# Altium PCB MB_v2.PcbDoc (part 3 of 10)
Units mm, origin at the board's own origin, x right, y up, seen from the top; angles counter-clockwise.
Board outline 203 x 72 mm, 6 copper layers (Top Layer, Layer 3, Layer 1, Layer 2, Layer 4, Bottom Layer), stack 1.52 mm thick; 655 components, 570 nets, 2931 pads, 1834 vias.
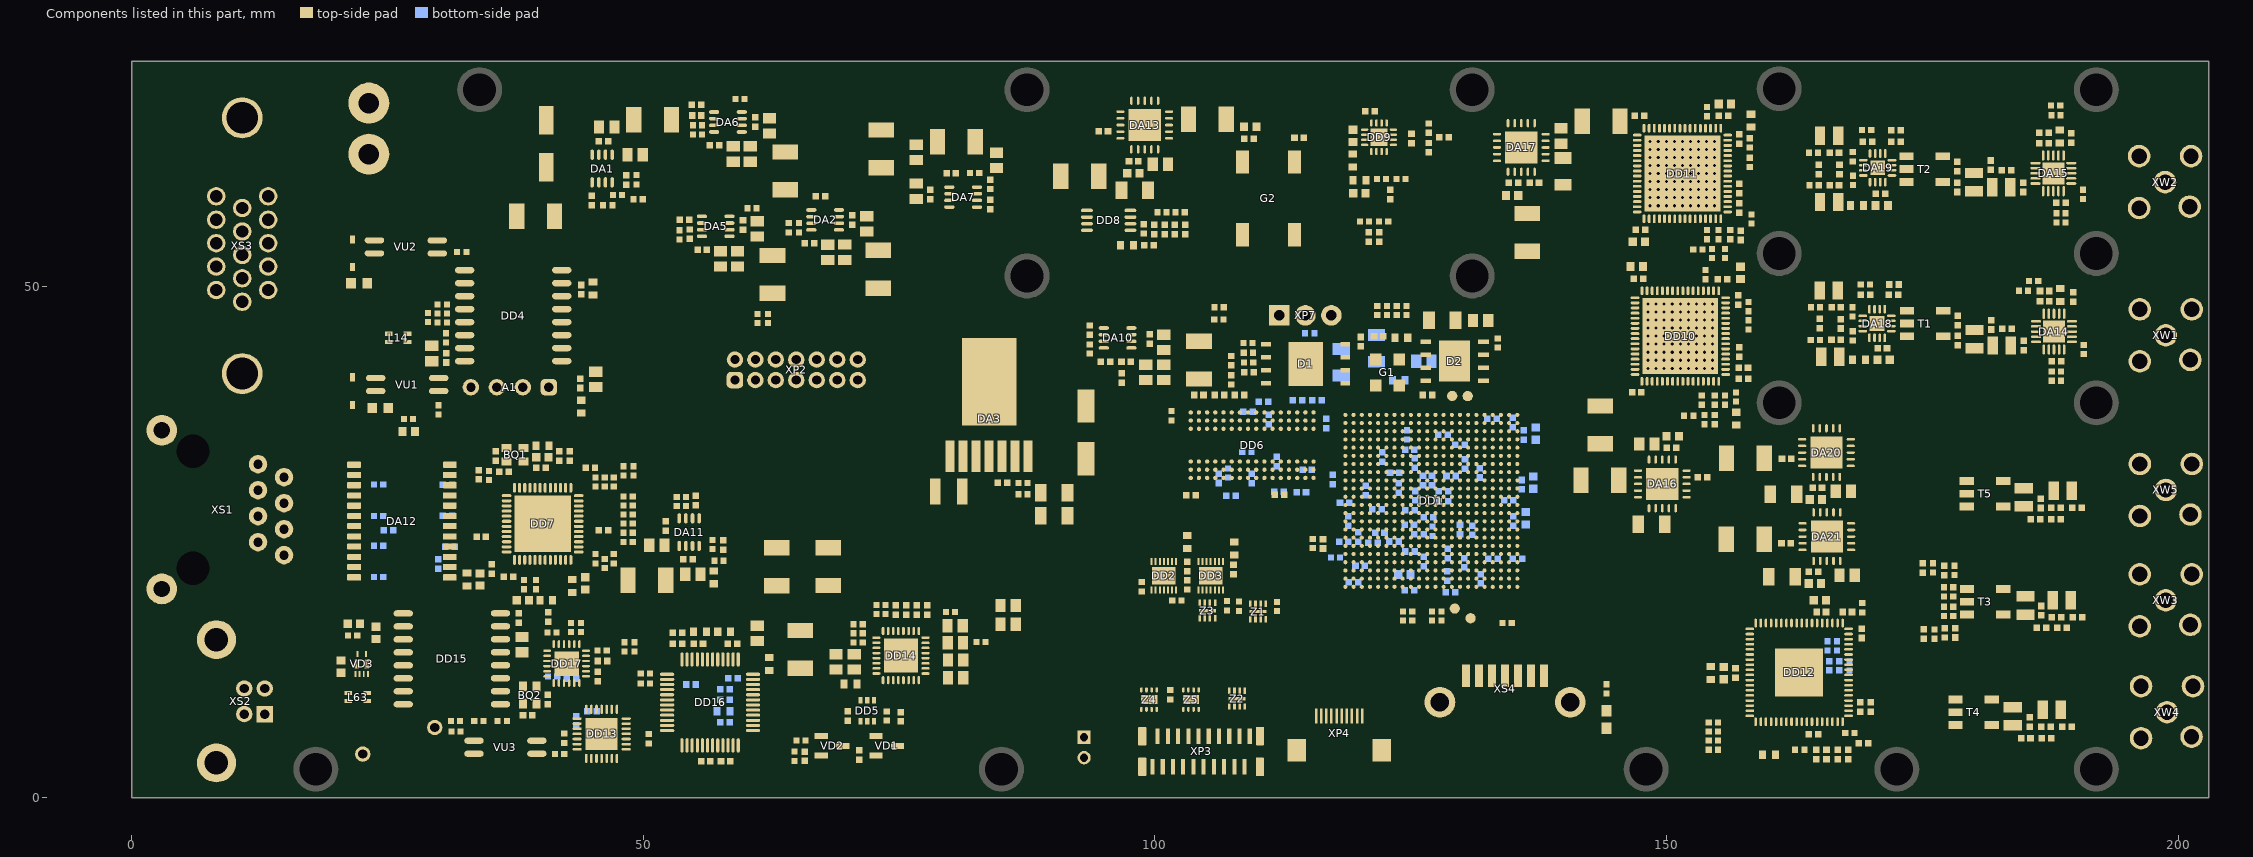
[diagram p6: the components of this part, seen from the top]

## Part data (continued)
R46: library part "Чип резистор 0402 120 Ом, 5%", "ЧИП-резистор", Tolerance=±5%, PackageReference=0402, TKE="100 ppm/°С"
R47 R48 R56: library part "Чип резистор 0402 80,6 Ом, 1%_1", "ЧИП-резистор", Tolerance=±1%, PackageReference=0402, TKE="100 ppm/°С"
R50: library part "Чип резистор 0402 9,53 кОм, 1%", "ЧИП-резистор", Tolerance=±1%, PackageReference=0402, TKE="100 ppm/°С"
R52 R53 R54 R55 R61 R75 R76 R78 R79 R81 R83 R98 R100 R119 R121 R123 R125 R139: library part "Чип резистор 0402 1 кОм, 5%", "ЧИП-резистор", Tolerance=±5%, PackageReference=0402, TKE="100 ppm/°С"
R57: library part "Чип резистор 0402 240 Ом, 5%", "ЧИП-резистор", Tolerance=±5%, PackageReference=0402, TKE="100 ppm/°С"
R60 R65 R66 R67 R68 R69: library part "Чип резистор 0402 22 Ом, 5%", "ЧИП-резистор", Tolerance=±5%, PackageReference=0402, TKE="100 ppm/°С"
R63: library part "Чип резистор 0402 5,76 кОм, 1%", "ЧИП-резистор", Tolerance=±1%, PackageReference=0402, TKE="100 ppm/°С"
R70: library part "Чип резистор 0402 120 кОм, 5%", "ЧИП-резистор", Tolerance=±5%, PackageReference=0402, TKE="100 ppm/°С"
R80: library part "Чип резистор 0402 12.4 кОм, 1%", "ЧИП-резистор", Tolerance=±1%, PackageReference=0402, TKE="100 ppm/°С"
R82 R84 R85 R86: library part "Чип резистор 0402 75 Ом, 5%", "ЧИП-резистор", Tolerance=±5%, PackageReference=0402, TKE="100 ppm/°С"
R87 R178: library part "Чип резистор 0402 330 Ом, 5%", "ЧИП-резистор", Tolerance=±5%, PackageReference=0402, TKE="100 ppm/°С"
R89 R90 R92 R93 R99 R113 R115 R116 R117 R118 R128 R129 R130 R135 R136 R140 R141 R142 R143 R184 R185 R186 R187 R188: library part "Чип резистор 0402 100 Ом, 5%", "ЧИП-резистор", Tolerance=±5%, PackageReference=0402, TKE="100 ppm/°С"
R101 R103 R105 R107: library part "Чип резистор 0402 130 Ом, 5%", "ЧИП-резистор", Tolerance=±5%, PackageReference=0402, TKE="100 ppm/°С"
R102 R104 R106 R108: library part "Чип резистор 0402 82 Ом, 5%", "ЧИП-резистор", Tolerance=±5%, PackageReference=0402, TKE="100 ppm/°С"
R120 R126 R169: library part "Чип резистор 0402 200 Ом, 5%", "ЧИП-резистор", Tolerance=±5%, PackageReference=0402, TKE="100 ppm/°С"
R131 R132 R133 R134: library part "Чип резистор 0402 10 Ом, 5%", "ЧИП-резистор", Tolerance=±5%, PackageReference=0402, TKE="100 ppm/°С"
R137 R138: library part "Чип резистор 0402 47 Ом, 5%", "ЧИП-резистор", Tolerance=±5%, PackageReference=0402, TKE="100 ppm/°С"
R145: library part "Чип резистор 0402 2.7 кОм, 5%", "ЧИП-резистор", Tolerance=±5%, LatestRevisionDate=17-Jul-2002, LatestRevisionNote="Re-released for DXP Platform.", PackageReference=0402, Published=8-Jun-2000, Publisher="Altium Limited", TKE="100 ppm/°С"
R147 R148 R149 R150: library part "Чип резистор 0402 49,9 Ом, 1%", "ЧИП-резистор", Tolerance=±1%, PackageReference=0402, TKE="100 ppm/°С"